# Altium PCB PCB1.PcbDoc
Units mil, origin at the board's own origin, x right, y up, seen from the top; angles counter-clockwise.
Board outline 4427 x 2162 mil, 2 copper layers (Top Layer, Bottom Layer); 81 components, 44 nets, 238 pads, 24 vias.
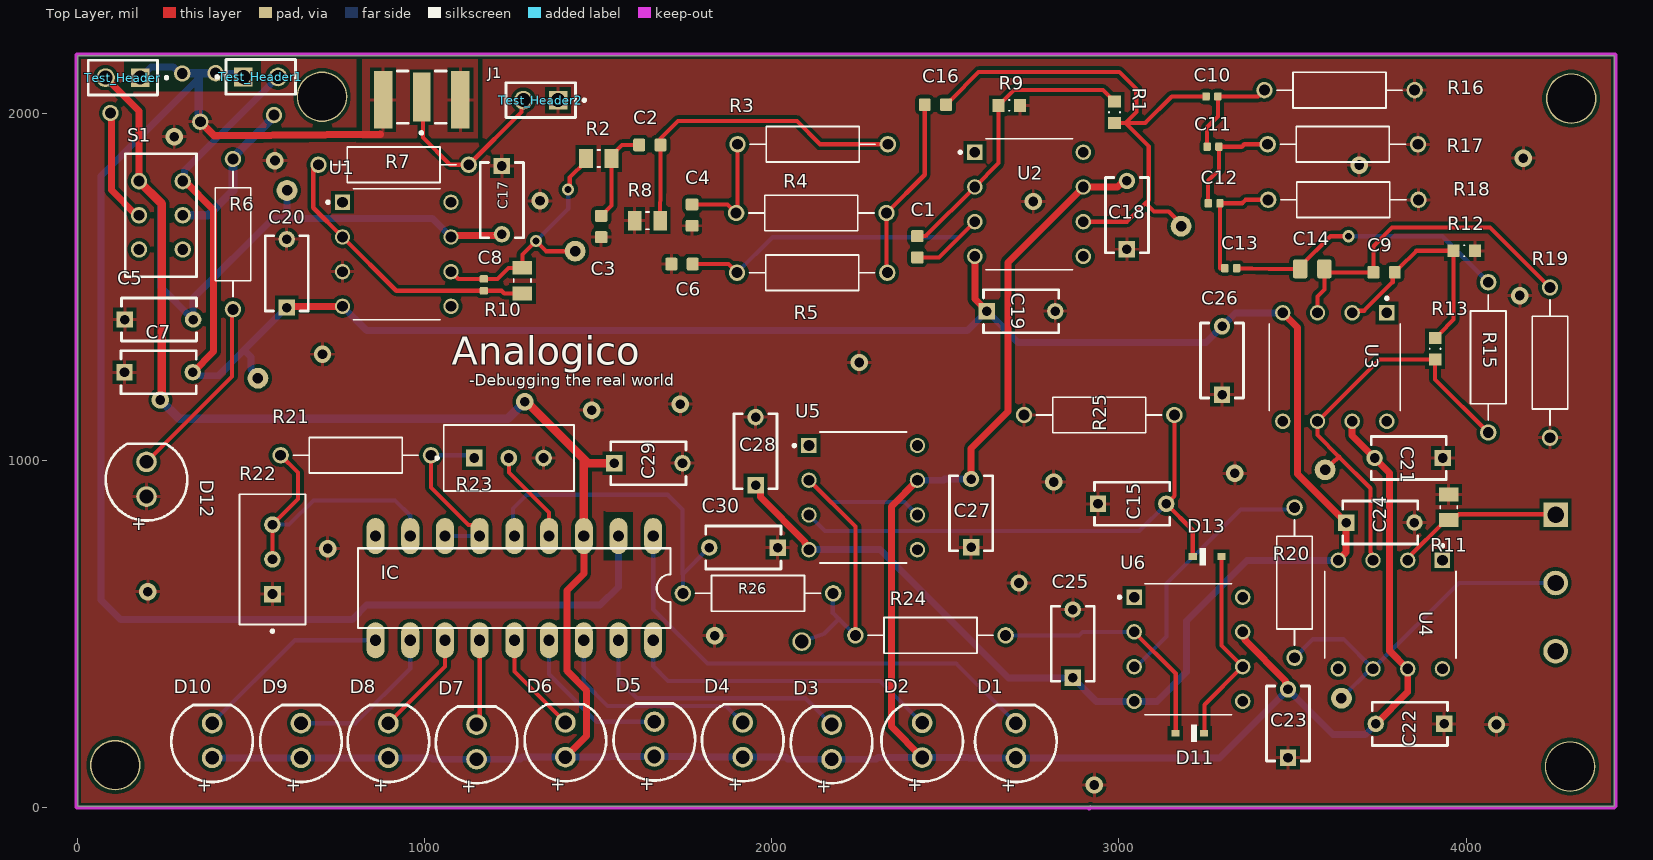
[diagram p0: Top Layer view]
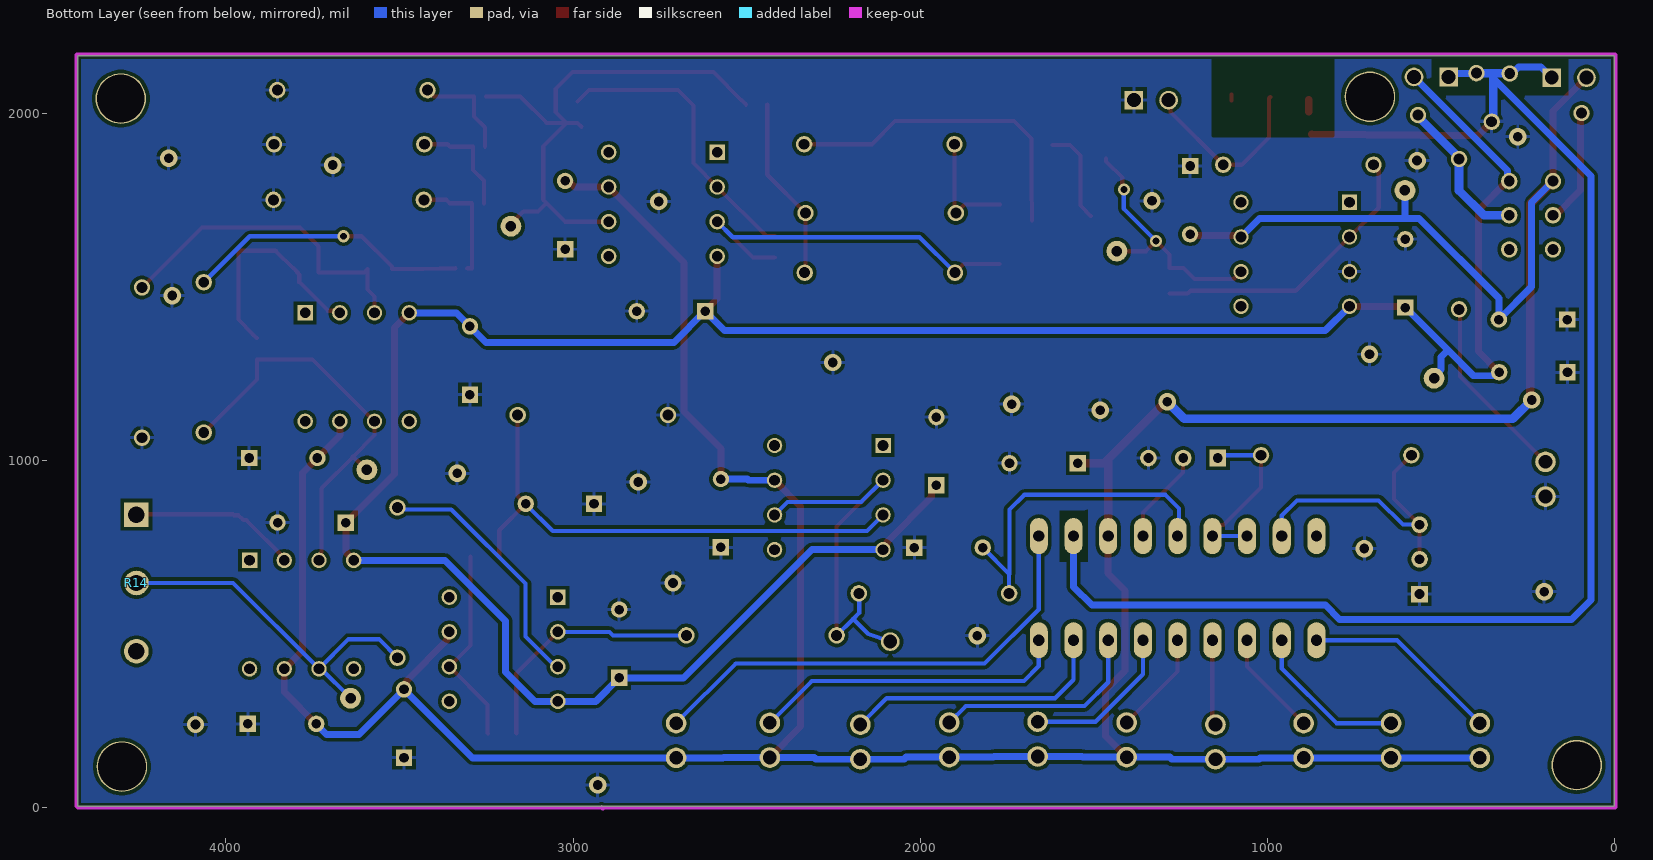
[diagram p1: Bottom Layer view, seen from below]
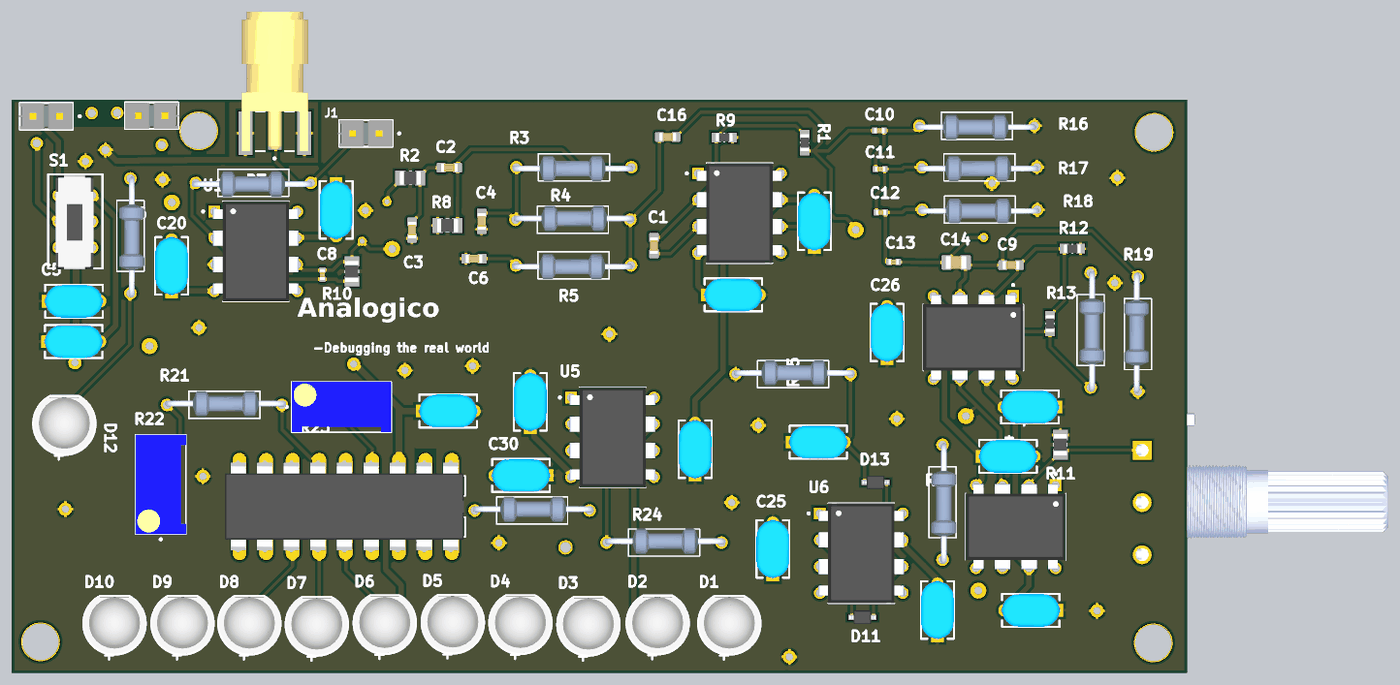
[diagram p2: 3D render of the assembled board from above, using the file's embedded part models]

## Layer stack, top to bottom
Top Solder: solder mask 0.4, Solder Resist, Dk 3.5
Top Layer: signal copper 1.4
Dielectric 1: dielectric 12.6, FR-4, Dk 4.8
Bottom Layer: signal copper 1.4
Bottom Solder: solder mask 0.4, Solder Resist, Dk 3.5

## Board outline
0,5 0,2167 4427,2167 4427,5

## Design rules (kind name [scope] priority, off if disabled: settings)
Clearance [All] p1: gap=10 ignorepadtopadclearanceinfootprint=FALSE
PolygonConnect [All] p1: connectstyle=Relief reliefconductorwidth=10 reliefentries=4 polygonreliefangle="90 Angle" airgapwidth=10
RoutingVias [All] p1: holewidth=28 width=50 viastyle="Through Hole" minholewidth=28 minwidth=50 maxholewidth=28 maxwidth=50
SolderMaskExpansion [All] p1: expansion=4 istentingtop=FALSE
SupplyNets "Schematic Supply Nets_4" [InNet('+9')] p1: voltage=0.000
SupplyNets "Schematic Supply Nets_3" [InNet('-9')] p2: voltage=0.000
SupplyNets "Schematic Supply Nets_2" [InNet('GND')] p3: voltage=0.000
SupplyNets "Schematic Supply Nets_1" [InNet('V+')] p4: voltage=0.000
SupplyNets "Schematic Supply Nets" [InNet('V-')] p5: voltage=0.000
Width [All] p1: maxlimit=25 minlimit=10 preferedwidth=12
30 further rules are at their usual default settings.

## Components (designator, comment, footprint, x,y, rotation, side; value= is the part's Value field where it differs from the comment)
C1 "10pF" CAPC1608X90N 2419,1616.71 r270 top
C2 "10uF" CAPC1608X90N 1648.29,1910 r0 top
C3 "4.7nF" CAPC1608X90N 1508,1675 r90 top
C4 "150pF" CAPC1608X90N 1770,1708 r90 top
C5 "0.1uF" FP-RDE2M1-MFG 234,1407 r0 top
C6 "150pF" CAPC1608X90N 1741,1567 r0 top
C7 "0.1uF" FP-RDE2M1-MFG 233,1255 r0 top
C8 "0.1uF" CAPC1005X55N 1170,1506.99 r90 top
C9 "10pF" CAPC1608X90N 3764,1543 r0 top
C10 "0.1uF" CAPC1005X55N 3267.99,2050 r0 top
C11 "0.1uF" CAPC1005X55N 3271,1905 r0 top
C12 "0.1uF" CAPC1005X55N 3273.99,1742 r0 top
C13 "0.1uF" CAPC1005X55N 3321.99,1555 r0 top
C14 "0.22uF" CAPC2012X135N 3557,1553 r0 top
C15 "0.22uF" FP-RDE2M1-MFG 3038,876 r0 top
C16 "150pF" CAPC1608X90N 2471,2026 r0 top
C17 "0.1uF" FP-RDE2M1-MFG 1222,1751 r270 top
C18 "0.1uF" FP-RDE2M1-MFG 3023,1708 r90 top
C19 "0.1uF" FP-RDE2M1-MFG 2718,1431 r0 top
C20 "0.1uF" FP-RDE2M1-MFG 602,1540 r90 top
C21 "0.1uF" FP-RDE2M1-MFG 3835,1008 r180 top
C22 "0.1uF" FP-RDE2M1-MFG 3838.43,242 r180 top
C23 "0.1uF" FP-RDE2M1-MFG 3487,243 r90 top
C24 "0.1uF" FP-RDE2M1-MFG 3753,822 r0 top
C25 "0.1uF" FP-RDE2M1-MFG 2867,473 r90 top
C26 "0.1uF" FP-RDE2M1-MFG 3297,1289 r90 top
C27 "0.1uF" FP-RDE2M1-MFG 2574,849 r90 top
C28 "0.1uF" FP-RDE2M1-MFG 1953,1027.43 r90 top
C29 "0.1uF" FP-RDE2M1-MFG 1644,993 r0 top
C30 "0.1uF" FP-RDE2M1-MFG 1918,750 r180 top
D1 "RED" WL-TMRC_5MM 2703,194 r90 top
D2 "RED" WL-TMRC_5MM 2433,195 r90 top
D3 "RED" WL-TMRC_5MM 2172,190 r90 top
D4 "RED" WL-TMRC_5MM 1916,196 r90 top
D5 "RED" WL-TMRC_5MM 1661.32,198.02 r90 top
D6 "RED" WL-TMRC_5MM 1405,196 r90 top
D7 "RED" WL-TMRC_5MM 1149,190 r90 top
D8 "RED" WL-TMRC_5MM 895,194 r90 top
D9 "RED" WL-TMRC_5MM 643,194 r90 top
D10 "RED" WL-TMRC_5MM 387,194 r90 top
D11 "1N4148" SOD2513X120N 3204,215 r180 top
D12 "RED" WL-TMRC_5MM 198,947 r90 top
D13 "1N4148" SOD2513X120N 3254,724 r0 top
IC "LM3914N" DIL18 1258,633 r180 top
J1 "SMA_Coaxial" SAMTEC_SMA-J-P-H-ST-EM1 991,2048 r180 top
R1 "33K" RESC1608X55N 2987,2004.29 r270 top
R2 "100ohm" RESC2012X65N 1501,1871 r0 top
R3 "2.7k" BigRes 2117.54,1912 r180 top
R4 "2.7k" BigRes 2113.54,1714 r0 top
R5 "2.7k" BigRes 2116,1542 r180 top
R6 "1k" BigRes 447,1653 r270 top
R7 "100ohm" BigRes 910,1853 r180 top
R8 "22k" RESC2012X65N 1641.19,1692 r0 top
R9 "56K" RESC1608X55N 2684,2024 r180 top
R10 "390k" RESC2012X65N 1281,1519 r90 top
R11 "10k" RESC2012X65N 3950,866 r270 top
R12 "56K" RESC1608X55N 3995,1605 r0 top
R13 "33K" RESC1608X55N 3911,1322.71 r90 top
R14 "10K" POT_PTN16-A05120K1B1 4258,844.85 r270 bottom
R15 "100k" BigRes 4064,1298 r270 top
R16 "390k" BigRes 3635.54,2068 r180 top
R17 "390k" BigRes 3645,1912 r180 top
R18 "390k" BigRes 3646.46,1752 r180 top
R19 "150k" BigRes 4242,1283 r90 top
R20 "10k" BigRes 3506,649 r270 top
R21 "1.2k" BigRes 801,1016 r0 top
R22 "Trimmer" TRIM_3296W-1-505LF 561,716 r90 top
R23 "Trimmer" TRIM_3296W-1-505LF 1242,1008 r0 top
R24 "10k" BigRes 2457,497 r0 top
R25 "390k" BigRes 2943,1132 r0 top
R26 "1k" BigRes 1960,618 r0 top
S1 "JS202011CQN" SPARKFUN-RETIRED_SWITCH-2.5X3.2-6 176.45,1608.98 r0 top
Test_Header "Comment" SAMTEC_TSW-102-07-F-S 130,2104 r180 top
Test_Header1 "Comment" SAMTEC_TSW-102-07-F-S 527,2106 r0 top
Test_Header2 "Comment" SAMTEC_TSW-102-07-F-S 1334,2039 r180 top
U1 "TL071" DIP794W45P254L959H508Q8 919,1595 r0 top
U2 "TL071" DIP794W45P254L959H508Q8 2741,1739 r0 top
U3 "TL071" DIP794W45P254L959H508Q8 3622,1270 r270 top
U4 "TL071" DIP794W45P254L959H508Q8 3782,557 r270 top
U5 "TL071" DIP794W45P254L959H508Q8 2263,894 r0 top
U6 "TL071" DIP794W45P254L959H508Q8 3200,457 r0 top

## Footprints (in the part's own frame and the unit in brackets; to place one, negate y for a bottom-side part, rotate by r counter-clockwise, add the part's x,y. Pads: shape width x height; smd on the part's side, far side on the other; paste and mask are expansions set on the pad)
BigRes [mm]
  round 1.2 hole 0.8: 1(-5.5,0) 2(5.5,0)
  silkscreen extent -4.58,-1.3 4.58,1.3, body extent -5.65,-1.07 5.9,1.33, height 2.4
CAPC1005X55N [mm]
  rrect25% 0.54x0.6 smd: 1(-0.432,0) 2(0.432,0)
  body extent -0.5,-0.25 0.5,0.25, height 0.55
CAPC1608X90N [mm]
  rrect25% 0.87x0.93 smd: 1(-0.78,0) 2(0.78,0)
  body extent -0.8,-0.4 0.8,0.4, height 0.9
CAPC2012X135N [mm]
  rrect25% 1.05x1.38 smd paste+0 mask+0.102: 1(-0.888,0) 2(0.888,0)
  body extent -1,-0.63 1,0.63, height 1.35
DIL18 [mil]
  oval 52x104 hole 32: 1(-400,-150) 2(-300,-150) 3(-200,-150) 4(-100,-150) 5(0,-150) 6(100,-150) 7(200,-150) 8(300,-150) 9(400,-150) 10(400,150) 11(300,150) 12(200,150) 13(100,150) 14(0,150) 15(-100,150) 16(-200,150) 17(-300,150) 18(-400,150)
  silkscreen extent -450,-115 450,115, body extent -445,-188 455,188, height 192
DIP794W45P254L959H508Q8 [mm]
  rect 1.13x1.13 / inner round 1.13 / far side rect 1.13x1.13 hole 0.78 mask+0.102: 1(-3.97,3.81)
  round 1.13 hole 0.78 mask+0.102: 2(-3.97,1.27) 3(-3.97,-1.27) 4(-3.97,-3.81) 5(3.97,-3.81) 6(3.97,-1.27) 7(3.97,1.27) 8(3.97,3.81)
  silkscreen extent -5.13,-4.8 3.17,4.8, body extent -4.1,-4.79 4.1,4.79, height 5.08
FP-RDE2M1-MFG [mm]
  rect 1.2x1.2 hole 0.7 paste-2539.97 mask+0: 1(-2.5,0)
  round 1.2 hole 0.7 paste-2539.97 mask+0: 2(2.5,0)
  silkscreen extent -2.75,-1.57 2.75,1.57, body extent -3.2,-1.68 3.2,1.68, height 0.25
POT_PTN16-A05120K1B1 [mm]
  rect 1.8x1.8 / inner round 1.8 / far side rect 1.8x1.8 hole 1.2: 1(0,0)
  round 1.8 hole 1.2: 2(5,0) 3(10,0)
  body extent -3.56,-23.53 13.44,5.97, height 21.2
RESC1608X55N [mm]
  rect 0.87x0.93 smd: 1(-0.78,0) 2(0.78,0)
  silkscreen extent -0.02,-0.4 0.03,0.4, body extent -0.8,-0.4 0.8,0.4, height 0.55
RESC2012X65N [mm]
  rect 1x1.42 smd: 1(-0.935,0) 2(0.935,0)
  silkscreen extent -0.12,-0.63 0.12,0.63, body extent -1,-0.63 1,0.63, height 0.65
SAMTEC_SMA-J-P-H-ST-EM1 [mm]
  rect 1.27x3.6 smd paste+0 mask+0.102: 1(0,0)
  rect 1.35x4.2 smd paste+0 mask+0.102: 2_1(-2.825,0.2) 3_1(2.825,0.2)
  silkscreen extent -1.8,-1.9 1.8,2.72, body extent -3.18,-11.42 3.18,1.91, height 3.55
SAMTEC_TSW-102-07-F-S [mm]
  rect 1.37x1.37 / inner round 1.37 / far side rect 1.37x1.37 hole 1.02: 01(-1.27,0)
  round 1.37 hole 1.02: 02(1.27,0)
  silkscreen extent -3.29,-1.27 2.54,1.27, body extent -2.54,-1.27 2.67,1.27, height 8.39
SOD2513X120N [mm]
  rect 0.6x0.5 smd paste+0 mask+0.102: A(1.05,0) C(-1.05,0)
  silkscreen extent -0.53,-0.63 -0.1,0.63, body extent -1.25,-0.65 1.25,0.65, height 1.2
SPARKFUN-RETIRED_SWITCH-2.5X3.2-6 [mm]
  round 1.2 hole 0.8: 1(0,0) 2(0,2.5) 3(0,5) 4(3.2,0) 5(3.2,2.5) 6(3.2,5)
  silkscreen extent -1,-2 4.2,7, body extent -0.28,-2.09 3.32,6.91, height 5.5
TRIM_3296W-1-505LF [mm]
  rect 1.218x1.218 / inner round 1.218 / far side rect 1.218x1.218 hole 0.71: 1(-2.54,0)
  round 1.218 hole 0.71: 2(0,0) 3(2.54,0)
  silkscreen extent -5.35,-2.41 4.76,2.42, body extent -4.76,-2.41 4.76,2.42, height 11.55
WL-TMRC_5MM [mil]
  round 59.37 hole 39.37: 1(50,0) 2(-50,0)
  silkscreen extent -119,-117 102,117, body extent -116,-116 96,116, height 343

## Part data
C1 C9: library part CL10C100JB8NNNC, "10 pF Â±5% 50V Ceramic Capacitor C0G, NP0 0603 (1608 Metric)", Package="SMD-2 Samsung", Check_prices=https://www.snapeda.com/parts/CL10C100JB8NNNC/Samsung/view-part/?ref=eda, MF=Samsung, MP=CL10C100JB8NNNC, SnapEDA_Link=https://www.snapeda.com/parts/CL10C100JB8NNNC/Samsung/view-part/?ref=snap
C2: library part CL10A106MQ8NNNC, "10 ÂµF Â±20% 6.3V Ceramic Capacitor X5R 0603 (1608 Metric)", Package="SMD-2 Samsung", Check_prices=https://www.snapeda.com/parts/CL10A106MQ8NNNC/Samsung/view-part/?ref=eda, MF="Samsung Electro-Mechanics", MP=CL10A106MQ8NNNC, SnapEDA_Link=https://www.snapeda.com/parts/CL10A106MQ8NNNC/Samsung/view-part/?ref=snap
C3: library part CL10B472KB8NNNC, "Ceramic capacitor SMD 0603 4.7 nF 50 V 10 % Samsung Electro-Mechanics CL10B472KB8NNNC 4000 pc(s)", Package="SMD-2 Samsung", Check_prices=https://www.snapeda.com/parts/CL10B472KB8NNNC/Samsung/view-part/?ref=eda, MF="Samsung Electro-Mechanics", MP=CL10B472KB8NNNC, SnapEDA_Link=https://www.snapeda.com/parts/CL10B472KB8NNNC/Samsung/view-part/?ref=snap
C4 C6 C16: library part CL10C151JB8NNNC, "150 pF Â±5% 50V Ceramic Capacitor C0G, NP0 0603 (1608 Metric)", Package="SMD-2 Samsung", Check_prices=https://www.snapeda.com/parts/CL10C151JB8NNNC/Samsung/view-part/?ref=eda, MF="Samsung Electro-Mechanics", MP=CL10C151JB8NNNC, SnapEDA_Link=https://www.snapeda.com/parts/CL10C151JB8NNNC/Samsung/view-part/?ref=snap
C5 C7 C15 C17 C18 C19 C20 C21 C22 C23 C24 C25 C26 C27 C28 C29 C30: library part CMP-06035-041039-1, "Ceramic Capacitor 100nF ±5% 50V C0G Radial"
C8 C10 C11 C12 C13: library part CL05B104KO5NNNC, "0.1 ÂµF Â±10% 16V Ceramic Capacitor X7R 0402 (1005 Metric)", Package="SMD-2 Samsung", Check_prices=https://www.snapeda.com/parts/CL05B104KO5NNNC/Samsung/view-part/?ref=eda, MF=Samsung, MP=CL05B104KO5NNNC, SnapEDA_Link=https://www.snapeda.com/parts/CL05B104KO5NNNC/Samsung/view-part/?ref=snap
C14: library part CL21B224KBFNNNE, "0.22 ÂµF Â±10% 50V Ceramic Capacitor X7R 0805 (2012 Metric)", Package="SMD-2 Samsung", Check_prices=https://www.snapeda.com/parts/CL21B224KBFNNNE/Samsung/view-part/?ref=eda, MF="Samsung Electro-Mechanics", MP=CL21B224KBFNNNE, SnapEDA_Link=https://www.snapeda.com/parts/CL21B224KBFNNNE/Samsung/view-part/?ref=snap
D1 D2 D3 D4 D5 D6 D7 D8 D9 D10 D12: library part SML-D12U1WT86, "LED Uni-Color Red 2-Pin Chip 0603(1608Metric) T/R", Case Code (Imperial)=0603, Case Code (Metric)=1608, Color=Red, Forward Current=20mA, Forward Voltage=2.2V, Lens Color=White, Manufacturer=ROHM, Max Operating Temperature=85°C, Min Operating Temperature=-40°C, Power Dissipation=54mW, Reverse Voltage=5V, Case/Package=1608, Category=Optoelectronics, ComponentLink1Description=https://datasheet.octopart.com:443/SML-D12U1WT86-ROHM-datasheet-175953608.pdf?src-supplier=Future+Electronics, ComponentLink1URL=https://datasheet.octopart.com:443/SML-D12U1WT86-ROHM-datasheet-175953608.pdf?src-supplier=Future+Electronics, ComponentLink2Description=https://datasheet.octopart.com:443/SML-D12U1WT86-Rohm-datasheet-68298509.pdf?src-supplier=Future+Electronics, ComponentLink2URL=https://datasheet.octopart.com:443/SML-D12U1WT86-Rohm-datasheet-68298509.pdf?src-supplier=Future+Electronics, ComponentLink3Description=https://datasheet.octopart.com:443/SML-D12U1WT86-Rohm-datasheet-62059860.pdf?src-supplier=Future+Electronics, ComponentLink3URL=https://datasheet.octopart.com:443/SML-D12U1WT86-Rohm-datasheet-62059860.pdf?src-supplier=Future+Electronics, ComponentLink4Description=https://datasheet.octopart.com:443/SML-D12U1WT86-Rohm-datasheet-138791993.pdf?src-supplier=Upverter, ComponentLink4URL=https://datasheet.octopart.com:443/SML-D12U1WT86-Rohm-datasheet-138791993.pdf?src-supplier=Upverter, ComponentLink5Description=https://datasheet.octopart.com:443/SML-D12U1WT86-ROHM-datasheet-142144710.pdf?src-supplier=TME, ComponentLink5URL=https://datasheet.octopart.com:443/SML-D12U1WT86-ROHM-datasheet-142144710.pdf?src-supplier=TME, ComponentLink6Description=https://datasheet.octopart.com:443/SML-D12U1WT86-Rohm-datasheet-142144708.pdf?src-supplier=Rohm+SCT, ComponentLink6URL=https://datasheet.octopart.com:443/SML-D12U1WT86-Rohm-datasheet-142144708.pdf?src-supplier=Rohm+SCT, Country of Origin="Japan, Mainland China, Malaysia", Dominant Wavelength=620nm, Export Control Classification Number (ECCN) Code=EAR99, Harmonized Tariff Schedule (HTS) Code=8541.40.20.00, Height=550µm, Introduction Date=2016-04-18, Lead Free="Lead Free", Length=1.6mm, Lens Transparency=Diffused, Lifecycle Status=Production, Luminous Flux=1Zlm, Luminous Intensity=63mcd, Manufacturer Part Number=SML-D12U1WT86, Mounting Technology="Surface Mount", Number of Circuits=1, Number of Terminals=2, Pricing="49=0.0757, 100=0.0539, 500=0.0424, 1000=0.0386, 3000=0.0317, 6000=0.0313 (USD)", REACH SVHC=Yes, RoHS=Compliant, Shape=Rectangular, Stock=11255, Supplier="Arrow Electronics", Supplier Part Number=SML-D12U1WT86, Terminal Pitch=1.65mm, Test Current=20mA, Wavelength=620nm, Width=800µm
D11 D13: library part 1N4148WS-7-F, "Diode Switching 75V 0.3A 2-Pin SOD-323", Package="SOD-323 Diodes Inc.", Check_prices=https://www.snapeda.com/parts/1N4148WS-7-F/Diodes+Inc./view-part/?ref=eda, MF="Diodes Inc.", MP=1N4148WS-7-F, SnapEDA_Link=https://www.snapeda.com/parts/1N4148WS-7-F/Diodes+Inc./view-part/?ref=snap
IC: "LED Lighting Drivers", Package=None, Availability=Unavailable, MF="Texas Instruments", MP=LM3914N, Price=None, SnapEDA_Link=https://www.snapeda.com/parts/LM3914N/Texas%20Instruments/view-part/4652973/?ref=snap
J1: library part SMA-J-P-H-ST-EM1, "SMA Connector Jack, Female Socket 50 Ohms Board Edge, End Launch Solder", Package=None, Check_prices=https://www.snapeda.com/parts/SMA-J-P-H-ST-EM1/Samtec+Inc./view-part/?ref=eda, MF=Samtec, MP=SMA-J-P-H-ST-EM1, SnapEDA_Link=https://www.snapeda.com/parts/SMA-J-P-H-ST-EM1/Samtec+Inc./view-part/?ref=snap
R1 R13: library part 0603WAF3302T5E, "33K Ohm 1/10W Thick Film Resistor 0603 Chip - Surface Mount", Package="0603-2 ROYAL", Check_prices=https://www.snapeda.com/parts/0603WAF3302T5E/Uni-Royal/view-part/?ref=eda, MF=Uni-Royal, MP=0603WAF3302T5E, SnapEDA_Link=https://www.snapeda.com/parts/0603WAF3302T5E/Uni-Royal/view-part/?ref=snap
R2: library part 0805W8F1000T5E, "100 Ohm 1/8W Thick Film Resistor 0805 Chip - Surface Mount", Package="0805-2 ROYAL", Check_prices=https://www.snapeda.com/parts/0805W8F1000T5E/Uni-Royal/view-part/?ref=eda, MF=Uni-Royal, MP=0805W8F1000T5E, SnapEDA_Link=https://www.snapeda.com/parts/0805W8F1000T5E/Uni-Royal/view-part/?ref=snap
R3 R4 R5 R6 R7 R15 R16 R17 R18 R19 R21 R25 R26: library part 10k, "RES 4.3K OHM 1% 1/6W AXIAL", Package="RADIAL-2 Yageo", Check_prices=https://www.snapeda.com/parts/MFR-12FTF52-4K3/Yageo/view-part/?ref=eda, MF=YAGEO, MP=MFR-12FTF52-4K3, SnapEDA_Link=https://www.snapeda.com/parts/MFR-12FTF52-4K3/Yageo/view-part/?ref=snap
R8: library part 0805W8F2202T5E, "22K Ohm 1/8W Thick Film Resistor 0805 Chip - Surface Mount", Package="0805-2 ROYAL", Check_prices=https://www.snapeda.com/parts/0805W8F2202T5E/Uni-Royal/view-part/?ref=eda, MF=Uni-Royal, MP=0805W8F2202T5E, SnapEDA_Link=https://www.snapeda.com/parts/0805W8F2202T5E/Uni-Royal/view-part/?ref=snap
R9 R12: library part 0603WAF5602T5E, "56K Ohm 1/10W Thick Film Resistor 0603 Chip - Surface Mount", Package=None, Check_prices=https://www.snapeda.com/parts/0603WAF5602T5E/Uni-Royal/view-part/?ref=eda, MF=Uni-Royal, MP=0603WAF5602T5E, SnapEDA_Link=https://www.snapeda.com/parts/0603WAF5602T5E/Uni-Royal/view-part/?ref=snap
R10: library part 0805W8F3903T5E, "390K Ohm 1/8W Thick Film Resistor 0805 Chip - Surface Mount", Package="0805-2 ROYAL", Check_prices=https://www.snapeda.com/parts/0805W8F3903T5E/Uni-Royal/view-part/?ref=eda, MF=Uni-Royal, MP=0805W8F3903T5E, SnapEDA_Link=https://www.snapeda.com/parts/0805W8F3903T5E/Uni-Royal/view-part/?ref=snap
R11: library part 0805W8F1002T5E, "10K Ohm 1/8W Thick Film Resistor 0805 Chip - Surface Mount", Package="0805-2 ROYAL", Check_prices=https://www.snapeda.com/parts/0805W8F1002T5E/Uni-Royal/view-part/?ref=eda, MF=Uni-Royal, MP=0805W8F1002T5E, SnapEDA_Link=https://www.snapeda.com/parts/0805W8F1002T5E/Uni-Royal/view-part/?ref=snap
R14: library part PTN16-A05120K1B1, "16.5 mm, Horizontal, Linear, 5 kÎ©, Through Hole, Knurled Shaft Single Section Rotary Potentiometer", Package=Package, Check_prices=https://www.snapeda.com/parts/PTN16-A05120K1B1/Same+Sky/view-part/?ref=eda, MF="Same Sky", MP=PTN16-A05120K1B1, SnapEDA_Link=https://www.snapeda.com/parts/PTN16-A05120K1B1/Same+Sky/view-part/?ref=snap
R20 R24: "RES 4.3K OHM 1% 1/6W AXIAL", Package="RADIAL-2 Yageo", Check_prices=https://www.snapeda.com/parts/MFR-12FTF52-4K3/Yageo/view-part/?ref=eda, MF=YAGEO, MP=MFR-12FTF52-4K3, SnapEDA_Link=https://www.snapeda.com/parts/MFR-12FTF52-4K3/Yageo/view-part/?ref=snap
R22 R23: library part 3296W-1-505LF, "TRIMMER,CERMET,REST 5M OHMS,PCB,25 TURNS,PWR-RTG 0.5W", Package="NON STANDARD-3 Bourns", Check_prices=https://www.snapeda.com/parts/3296W-1-505LF/Bourns/view-part/?ref=eda, MF=Bourns, MP=3296W-1-505LF, SnapEDA_Link=https://www.snapeda.com/parts/3296W-1-505LF/Bourns/view-part/?ref=snap
S1: "Switch, Slide, DPDT, ON-ON, Top Slide, 300mA, 6VDC, ThruHole, PC Pin", Package=None, Check_prices=https://www.snapeda.com/parts/JS202011CQN/C%2526K/view-part/?ref=eda, MF=C&K, MP=JS202011CQN, SnapEDA_Link=https://www.snapeda.com/parts/JS202011CQN/C%2526K/view-part/?ref=snap
U1 U2 U3 U4 U5 U6: library part TL071CP, "Single, 30-V, 3-MHz, high slew rate (13-V/Âµs), In to V+, JFET-input op amp", Package="PDIP-8 Texas", Check_prices=https://www.snapeda.com/parts/TL071CP/Texas+Instruments/view-part/?ref=eda, MF="Texas Instruments", MP=TL071CP, SnapEDA_Link=https://www.snapeda.com/parts/TL071CP/Texas+Instruments/view-part/?ref=snap

## Free pads (board coordinates)
  round 47.24 hole 31.5: 2(94,2002) 3(353,1977) 4(565.33,1996.02) 5(301,2116) 5(397,2117)
  round 145.67 hole 137.8 unplated: 7(108,123) 7(704,2049) 7(4300,119) 7(4303.01,2043.44)
  round 60 hole 30: 12(519,1238) 13(603,1779) 14(1433,1604) 15(3179,1676) 16(3594,974) 18(3641,316)
  round 53.94 hole 40.16: 19(2086,479)

## Via types
v1: diameter 50, hole 28, Top Layer to Bottom Layer, 21 vias
v2: diameter 35, hole 20, Top Layer to Bottom Layer, 3 vias

## Nets (pads, with @x,y where several pads share a name; then routed paths per layer and width w, separated by ;. In a path a pad name is that pad's centre, name@x,y a point inside that pad or via, vN(x,y) a via of type N, cw(c..) or ccw(c..) an arc to the next point about the centre after c; other vN are vias at no path point)
+9: C5.2 C17.2 C18.2 C21.2 C22.2 C23.2 C27.2 C29.1 D1.2 D2.2 D3.2 D4.2 D5.2 D6.2 D7.2 D8.2 D9.2 D10.2 IC.3 pad.13 S1.3 Test_Header.02 U1.7 U2.7 U3.7 U4.7 U5.7 U6.7 | length 11801.9
  Top Layer w12: U1.7 U1.7@1079.09,1648.79 ; C17.2@1218.21,1648.79 C17.2
  Top Layer w20: Test_Header.02 176.45,2007.55 S1.3 ; U1.7@1079.09,1648.79 C17.2@1218.21,1648.79 ; v1(1288,1170) v1@1293,1170 ; D6.2 1466,207 1466,338 1409,395 1409,626 1458,675 IC.3 ; U5.7 2344,868.7 2344,234 D2.2 ; C27.2 2574,1036 2680,1142 2680,1571.7 U2.7 2996.04,1789 3013.46,1806.43 C18.2 ; U6.7 3362.52,500.78 3362.52,483.48 3480.26,365.74 3480.26,348.17 C23.2 ; U3.7 3672,1072.57 C21.2 3780,964.57 3780,452.7 U4.7 3832,334 C22.2
  Top Layer w25: S1.3 242,1740.28 v1@242,1175 ; v1@1293,1170 1458,1005 ; IC.3 1458,885.54 1458,1005 ; C29.1@1545,993 1470,993 1458,1005
  Bottom Layer w20: S1.3 238,1744.28 238,1501.43 C5.2 332.43,1468.43 562,1698 603,1698 ; D10.2 D9.2 D8.2 1020,144 1024,140 D7.2 1274,140 1280,146 D6.2 1532,146 1534.02,148.02 D5.2 1787,148.02 1789.02,146 D4.2 2041,146 2047,140 D3.2 2300,140 2305,145 D2.2 2567,145 2568,144 D1.2 3289.58,144 C23.2 3616.43,212 3710,212 C22.2 ; pad.13 603,1698 ; U1.7 1022.3,1698 603,1698 ; U5.7 2494,944 2497.42,947.43 C27.2
  Bottom Layer w25: v1(238,1175) 292,1121 1239,1121 v1(1288,1170)
-9: C7.2 C19.1 C20.1 C24.1 C25.1 C26.2 C28.1 pad.12 S1.6 Test_Header1.02 U1.4 U2.4 U3.4 U4.4 U5.4 U6.4 | length 7653.5
  Top Layer w12: C28.1 C28.1@1956.29,925.71
  Top Layer w20: S1.6 308.17,1805.83 391,1723 391,1314.57 C7.2 ; C20.1 605.43,1445 U1.4 ; C28.1@1956.29,925.71 1966.62,915.38 1966.62,895.38 2095.41,766.59 2095.41,761.92 2106.7,750.63 U5.4 ; U2.4 2584.7,1465.88 C19.1 ; U3.4 3514,1384.3 3514,1131.44 3514.24,1131.2 3514.24,1096.2 3514,1095.96 3514,962.58 C24.1 3654.57,736.57 3632,714 U4.4
  Bottom Layer w12: S1.6 S1.6@307.06,1810.46
  Bottom Layer w20: S1.6@307.06,1810.46 307.55,1810.95 307.55,1836.55 Test_Header1.02 ; C7.2@331.43,1245.02 405.45,1245.02 479.21,1318.79 ; pad.12 499.5,1263.5 499.5,1298.5 479.21,1318.79 ; C20.1 479.21,1318.79 ; U1.4 832.7,1375 2563.57,1375 C19.1 2709.58,1341 3250.58,1341 C26.2 3335.88,1426.3 U3.4 ; U5.4 2312,744 2681.43,374.58 C25.1 2934.57,307 U6.4 3110,307 3195,392 3195,539 3369.3,713.3 U4.4
Amp_Out: pad.18 R14.2 R20.2 U4.6 | length 1037.7
  Bottom Layer w12: R20.2 3559.53,486 3646.7,486 U4.6 ; pad.18 3726.7,400.7 U4.6 ; R14.2 3979.3,648 U4.6
FILTER_OUT: C10.1 C16.2 pad.15 R1.2 U2.6 | length 1628.6
  Top Layer w12: C16.2 2501.71,2027.18 2512.83,2038.31 2514.02,2038.31 2595.71,2120 3001,2120 3050,2071 3050,2005.16 3018.42,1973.58 ; U2.6 3023,1689 3076.5,1742.5 ; R1.2@2975.87,1962.46 R1.2 3018.42,1973.58 ; pad.15 3179,1683 3143.5,1718.5 3100.5,1718.5 3076.5,1742.5 ; C10.1 3152,2050 3075.58,1973.58 3018.42,1973.58 ; 3018.42,1973.58 3086,1906 3086,1752 3076.5,1742.5
GND: C3.1 C4.1 C5.1 C6.1 C7.1 C15.1 C17.1 C18.1 C19.2 C20.2 C21.1 C22.1 C23.1 C24.2 C25.2 C26.1 C27.1 C28.2 C29.2 C30.1 D12.2 IC.2 J1.2_1 J1.3_1 pad.3 pad.5 R8.1 R9.1 R11.1 R12.2 R16.1 R17.1 R18.1 R19.1 R22.1 R23.3 R25.1 Test_Header1.01 Test_Header2.01 Test_Header.01 U1.3 | length 4375.2
  Top Layer w12: J1.2_1@1103.22,2038.16 J1.2_1@1103.22,2055.13
  Top Layer w22: pad.3 393.8,1936.2 403.02,1936.2 871.57,1940.97 ; J1.3_1@879.78,2005.78 J1.3_1
  Bottom Layer w20: Test_Header.01 211,2135 275.66,2135 294.66,2116 pad.5@301,2116 ; 349,2103 67,1821 67,599 123,543 791.5,543 832.5,584 1505,584 1558,637 IC.2 ; pad.5@397.5,2116.5 466.5,2116.5 Test_Header1.01
  Bottom Layer w25: pad.5@294.98,2116 pad.5@301,2116 ; pad.5@301.5,2116.5 349,2116.5 ; pad.3 349,1981 349,2103 349,2116.5 ; pad.5@396.5,2116.5 349,2116.5 ; pad.5@397,2117 pad.5@397.5,2116.5
  other v1: 2929,66 4088,240 1835,496 202,623 2712,648 720,747 2812,939 3334,964 1481,1146 1736,1163 2251.29,1283.16 705,1307 4155,1476 2753,1747 1332,1749 3692,1852 568,1865 4165,1872 278,1934
High_Pass_Out: pad.16 R13.1 R15.2 U3.6 U4.3 | length 1213.6
  Top Layer w12: pad.16@3591,978 pad.16 3634.5,1011.5 ; U4.3 3725.78,719.52 3725.78,735.79 3725,736.57 3725,921 3634.5,1011.5 ; R15.2 3911,1234.47 R13.1 3750.3,1292 U3.6 3572,1074 3634.5,1011.5
integrator_out: C8.2 pad.14 R2.1 R10.2 U1.6 | length 743.7
  Top Layer w12: U1.6 1096.3,1524 C8.2 1209,1524 1240.81,1555.81 R10.2 1281,1594 v2(1320,1633) 1349,1604 pad.14 ; v2(1413,1782) 1417.4,1786.4 1417.4,1815.94 1464.19,1862.73 R2.1
  Bottom Layer w12: v2(1320,1633) 1413,1726 v2(1413,1782)
NetC1_1: C1.1 R1.1 R9.2 U2.2 | length 853.4
  Top Layer w12: C1.1 2443.12,1647.42 U2.2 2653.29,1857.59 R9.2 2697.29,2068 2954,2068 R1.1
NetC1_2: C1.2 C6.2 R5.2 U2.3 | length 1092.6
  Top Layer w12: C6.2 1874.46,1567 R5.2 ; C1.2 2481.7,1586 U2.3
  Bottom Layer w12: R5.2 2001.46,1644 2539.7,1644 U2.3
NetC2_1: C2.1 C3.2 R2.2 | length 279.1
  Top Layer w12: C3.2 1509.18,1705.71 1520.31,1716.84 1520.31,1718.02 1537.81,1735.52 R2.2 1537.81,1879.27 1568.54,1910 C2.1
NetC2_2: C2.2 R3.1 R8.2 | length 940.5
  Top Layer w12: R8.2 1679,1802 C2.2 1679,1929 1729,1979 2072,1979 2139,1912 R3.1
NetC4_2: C4.2 R3.2 R4.1 | length 336.9
  Top Layer w12: C4.2 1872.29,1738.71 R4.1 1901,1718 R3.2
NetC8_1: C8.1 R7.2 R10.1 U1.2 | length 824.6
  Top Layer w12: R7.2@678.46,1849 678.46,1729.24 U1.2 917.72,1489.99 C8.1 1221,1489.99 1228.79,1482.19 R10.1
NetC9_1: C9.1 C14.2 R19.2 U3.3 | length 958.1
  Top Layer w12: U3.3 3572,1473.49 3591.96,1493.45 C14.2 3601.96,1543 C9.1 3733.29,1618.29 3787,1672 4069.54,1672 R19.2
NetC9_2: C9.2 R12.1 R13.2 U3.2 | length 654.4
  Top Layer w12: U3.2 3678.22,1432.52 3706.52,1432.52 3788.66,1514.66 3788.66,1536.95 C9.2 3794.71,1544.18 3805.83,1555.31 3807.02,1555.31 3856.71,1605 R12.1 3964.29,1406.71 3923.31,1365.73 3923.31,1364.54 3912.18,1353.42 R13.2
NetC10_2: C10.2 C11.1 R16.2 | length 299.3
  Top Layer w12: C11.1 3253.99,1961 3285,1992.01 C10.2 3401,2050 R16.2
NetC11_2: C11.2 C12.1 R17.2 | length 319.2
  Top Layer w12: C12.1 3256.98,1807 3288.01,1838.03 C11.2 3354,1905 3361,1912 R17.2
NetC12_2: C12.2 C13.1 R18.2 | length 344.1
  Top Layer w12: C13.1 3291,1555 C12.2 3355,1742 3365,1752 R18.2
NetC13_2: C13.2 C14.1 R15.1 | length 822.6
  Top Layer w12: C13.2 3432,1553 C14.1 3522.04,1559.5 3609.54,1647 v2(3661,1647)
  Bottom Layer w12: v2(3661,1647) 3931.54,1647 R15.1
NetC15_2: C15.2 D13.C R25.2 U5.3 | length 1530.2
  Top Layer w12: R25.2 3159.54,899.11 C15.2 3212.66,799.77 D13.C
  Bottom Layer w12: U5.3 2152.7,798 3058.43,798 C15.2
NetC16_1: C16.1 R4.2 R5.1 | length 530.7
  Top Layer w12: R5.1 2330.07,1544.47 R4.2 2440.29,1824.22 C16.1
NetC30_2: C30.2 IC.5 R26.1 | length 953
  Bottom Layer w12: IC.5 1254,787 1254,863 1293,902 1700,902 1742.46,859.54 1742.46,673.89 ; R26.1 1743.46,673.89 C30.2
NetD1_1: D1.1 IC.1 | length 1391.9
  Bottom Layer w12: IC.1 1658,572 1814,416 2531,416 D1.1
NetD2_1: D2.1 IC.18 | length 916.9
  Bottom Layer w12: IC.18 1658,409 1701,366 2312,366 D2.1
NetD3_1: D3.1 IC.17 | length 781.4
  Bottom Layer w12: IC.17 1558,369 1611.29,315.71 2096.29,315.71 D3.1
NetD4_1: D4.1 IC.16 | length 627
  Bottom Layer w12: IC.16 1458,362 1526.29,293.71 1868.29,293.71 D4.1
NetD5_1: D5.1 IC.15 | length 458.1
  Bottom Layer w12: IC.15 1358,385 1494.98,248.02 D5.1
NetD6_1: D6.1 IC.14 | length 297.9
  Top Layer w12: IC.14 1258,393 D6.1
NetD7_1: D7.1 IC.13 | length 246.7
  Top Layer w12: D7.1 1158,249 IC.13
NetD8_1: D8.1 IC.12 | length 306.5
  Top Layer w12: D8.1 1058,407 IC.12
NetD9_1: D9.1 IC.11 | length 461.4
  Bottom Layer w12: D9.1 800,244 958,402 IC.11
NetD10_1: D10.1 IC.10 | length 570
  Bottom Layer w12: D10.1 626,483 IC.10
NetD11_A: D11.A R24.2 U6.2 | length 726
  Top Layer w12: U6.2 3163.66,387.04 3163.66,216 D11.A
  Bottom Layer w12: R24.2@2663.99,497 2885,497 2895,507 U6.2
NetD11_C: D11.C D13.A U6.6 | length 580.2
  Top Layer w12: D11.C 3246.34,216 3246.34,297.04 U6.6 3295.34,467.96 D13.A
NetD12_1: D12.1 R6.2 | length 542.3
  Top Layer w12: D12.1 444,1243 R6.2@444,1437.4
NetIC_4: IC.4 R23.2 | length 273
  Top Layer w12: R23.2 1242.98,1007.03 1242.98,966.02 1358,851 IC.4
NetIC_6: IC.6 IC.7 R21.2 R23.1 | length 525.9
  Top Layer w12: R21.2 1018,1015.54 1018,923 1125.89,815.11 1139.52,815.11 1158,796.64 IC.6
  Bottom Layer w12: R21.2 1135.01,1016 R23.1@1141.54,1009.48 ; IC.7 IC.6
NetIC_8: IC.8 R21.1 R22.2 R22.3 | length 854.4
  Top Layer w12: R22.2 R22.3 634.46,889.46 634.46,966 R21.1
  Bottom Layer w12: R22.3 609,816 679,886 914,886 958,842 IC.8
NetJ1_1: J1.1 R7.1 Test_Header2.02 | length 533.7
  Top Layer w12: J1.1 994.37,2044.63 994.37,1931.63 1073,1853 R7.1 1278.47,2004.93 1278.47,2033.47 Test_Header2.02
NetR11_2: R11.2 R14.1 U4.2 | length 484.6
  Top Layer w12: U4.2 3832,719.46 3941.73,829.19 R11.2 3963.69,842.87 3976.86,842.87 3979.98,846 R14.1@4258,846
NetR20_1: R20.1 U6.3 | length 741.3
  Bottom Layer w12: U6.3 3050,407 3137,494 3137,646 3351,860 3500.47,860 R20.1
Rectified: pad.19 R24.1 R26.2 U5.2 U5.6 | length 1132.9
  Top Layer w12: U5.2 2240.46,810.24 R24.1
  Bottom Layer w12: pad.19 2149.32,501.32 2192.73,544.73 ; U5.2 2169.7,881 2382.3,881 U5.6 ; R26.2@2175.54,618 2175.54,561.93 2192.73,544.73 ; R24.1 2192.73,544.73
V+: pad.2 S1.2 | length 332.8
  Top Layer w20: pad.2 97,1999 97,1780 169.59,1707.41 S1.2
V-: pad.4 R6.1 S1.5 | length 437.5
  Bottom Layer w12: S1.5 S1.5@303.35,1708.33 ; pad.4@565.33,1991.94 pad.4
  Bottom Layer w25: S1.5 375.41,1707.41 447,1779 R6.1 ; R6.1@447,1873.61 pad.4@565.33,1991.94
pads on no net: IC.9 R14.3 S1.1 S1.4 U1.1 U1.5 U1.8 U2.1 U2.5 U2.8 U3.1 U3.5 U3.8 U4.1 U4.5 U4.8 U5.1 U5.5 U5.8 U6.1 U6.5 U6.8

## Polygon pours and split planes (outlines as drawn)
GND on Top Layer "GND_L01_P000" (solid, pour order 0): 133,2191 133,2064 528,2064 528,2164.73 802,2163.55 802,1917 1167,1917 1167,2191 4426,2191 4426,5 0,5 0,2191 95.51,2191
GND on Top Layer "GND_L01_P003" (solid, pour order 3): 820,2174 1153,2174 1153,1929 820,1929
GND on Bottom Layer "GND_L02_P001" (solid, pour order 1): 131,2181.4 131,2051.45 527,2053 527,2178.4 805,2181.4 805,1934.6 809,1930.6 1157,1930.6 1161,1934.6 1161,2181.4 4429.18,2181.4 4429.18,-11.42 4416.16,1.61 -17.63,1.61 -17.63,2178.4 -20.63,2181.4 -20.63,2188.4 -13.63,2181.4

## Keep-outs
Keep-Out Layer:
  lines w10: 4427,0 0,0 ; 4432,5 4432,2167 ; -5,5 ccw(c0,5) 0,0 ; -5,5 ccw(c0,5) 0,0 ; -5,5 -5,2167 ; -5,2167 cw(c0,2167) 0,2172 ; -5,2167 cw(c0,2167) 0,2172 ; 0,2172 4427,2172 ; 4427,2172 cw(c4427,2167) 4432,2167 ; 4427,2172 cw(c4427,2167) 4432,2167 ; 2913,-3 ccw(c2913,2) 2918,2 cw(c2913,2) 2913,-3

## Other copper
Top Layer:
  pour cut-out: 1521,852 1599,852 1599,714 1600,713 1516,713 1516,852 1515,853 1516,854 1520,854
Bottom Layer:
  pour cut-out: 1515,858 1599,858 1599,707 1516,707 1516,860 1515,861
  pour cut-out: 1515,858 1599,858 1599,707 1516,707 1516,860 1515,861
  pour cut-out: 1515,858 1599,858 1599,707 1516,707 1516,860 1515,861

## Silkscreen, mask and mechanical layers (free items; w line width, h text height)
Top Overlay:
  text "Analogico" at 1077,1250 h138.74
  text "-Debugging the real world" at 1128,1215.81 h32.44

## Text inside footprints (layer, text, board x,y; h text height)
D1: Top Overlay "+" at 2698.35,41.24 h40 r90; Top 3D Body "+" at 2697.84,40.97 h40 r90
D2: Top Overlay "+" at 2428.35,42.24 h40 r90; Top 3D Body "+" at 2427.84,41.97 h40 r90
D3: Top Overlay "+" at 2167.35,37.24 h40 r90; Top 3D Body "+" at 2166.84,36.97 h40 r90
D4: Top Overlay "+" at 1911.35,43.24 h40 r90; Top 3D Body "+" at 1910.84,42.97 h40 r90
D5: Top Overlay "+" at 1656.67,45.26 h40 r90; Top 3D Body "+" at 1656.16,44.99 h40 r90
D6: Top Overlay "+" at 1400.35,43.24 h40 r90; Top 3D Body "+" at 1399.84,42.97 h40 r90
D7: Top Overlay "+" at 1144.35,37.24 h40 r90; Top 3D Body "+" at 1143.84,36.97 h40 r90
D8: Top Overlay "+" at 890.35,41.24 h40 r90; Top 3D Body "+" at 889.84,40.97 h40 r90
D9: Top Overlay "+" at 638.35,41.24 h40 r90; Top 3D Body "+" at 637.84,40.97 h40 r90
D10: Top Overlay "+" at 382.35,41.24 h40 r90; Top 3D Body "+" at 381.84,40.97 h40 r90
D12: Top Overlay "+" at 193.35,794.24 h40 r90; Top 3D Body "+" at 192.84,793.97 h40 r90
J1: Mechanical 13 "PCB EDGE" at 821.55,2114.99 h24 r180
R14: Mechanical 13 "PCB Edge" at 4395.8,283.83 h35.43 r90